# Altium PCB OFP_SCM_v1.5.PcbDoc (part 2 of 3)
Units mil, origin at the board's own origin, x right, y up, seen from the top; angles counter-clockwise.
Board outline 4724.41 x 4330.71 mil, 2 copper layers (Top Layer, Bottom Layer), stack 62.256 mil thick; 99 components, 80 nets, 450 pads, 371 vias.
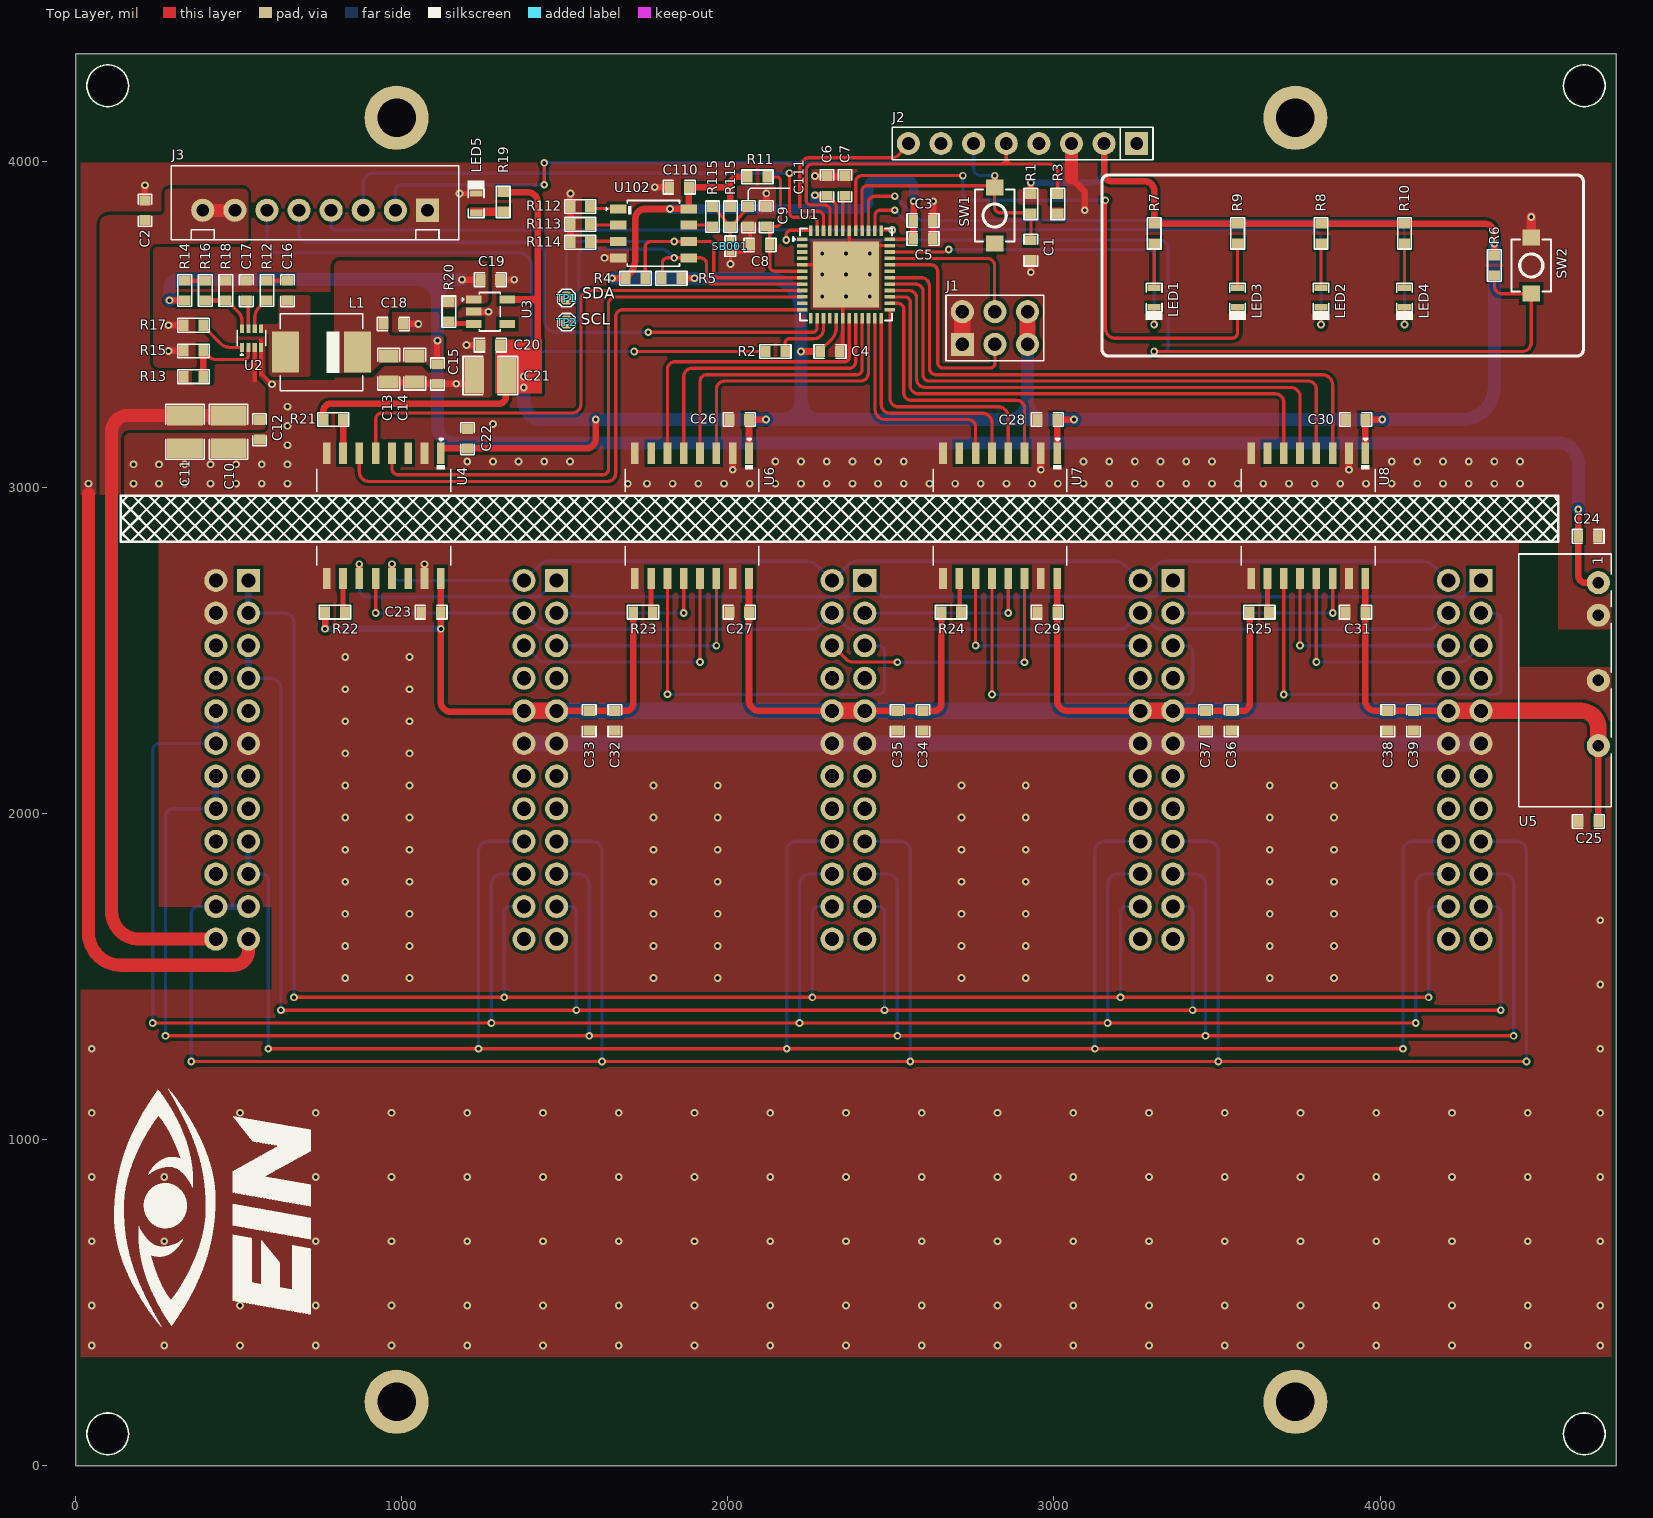
[diagram p0: Top Layer view]

## Via types
v1: diameter 23.62, hole 11.81, Top Layer to Bottom Layer, tented both sides, 371 vias

## Nets (pads, with @x,y where several pads share a name; then routed paths per layer and width w, separated by ;. In a path a pad name is that pad's centre, name@x,y a point inside that pad or via, vN(x,y) a via of type N, cw(c..) or ccw(c..) an arc to the next point about the centre after c; other vN are vias at no path point) (continued)
+3V3: (continued)
  Top Layer w20: v1(764.88,2566.93) R22.2@764.88,2618.11 ; C23.2@1119.88,2618.11 1119.88,2615.35 v1(1119.88,2566.93) 1119.88,2343.65 ccw(c1150.93,2343.65) 1150.93,2312.6 J5.10@1374.8,2312.6 ; C23.2@1119.88,2623.11 U4.16@1119.88,2721.46 ; J5.9@1474.8,2315.35 C33.2@1574.8,2315.35 C32.2@1653.54,2315.35 1688.09,2315.35 ccw(c1688.09,2337.03) 1709.76,2337.03 R23.1@1709.76,2618.11 ; C27.2@2064.76,2618.11 2064.76,2346.41 ccw(c2095.82,2346.41) 2095.82,2315.35 J6.10@2319.68,2315.35 ; U6.16@2064.76,2721.46 2064.76,2623.11 ccw(c2069.76,2623.11) C27.2@2069.76,2618.11 ; J6.9@2419.68,2315.35 C35.2@2519.68,2315.35 C34.2@2598.42,2315.35 2632.97,2315.35 ccw(c2632.97,2337.03) 2654.65,2337.03 R24.1@2654.65,2618.11 ; C29.2@3009.65,2618.11 3009.65,2346.41 ccw(c3040.7,2346.41) 3040.7,2315.35 J7.10@3264.57,2315.35 ; U7.16@3009.65,2721.46 3009.65,2623.11 ccw(c3014.65,2623.11) C29.2@3014.65,2618.11 ; J7.9@3364.57,2315.35 C37.2@3464.57,2315.35 C36.2@3543.31,2315.35 3577.85,2315.35 ccw(c3577.85,2337.03) 3599.53,2337.03 R25.1@3599.53,2618.11 ; U8.16@3954.53,2721.46 C31.2@3954.53,2618.11 3954.53,2346.41 ccw(c3985.58,2346.41) 3985.58,2315.35 C38.2@4023.62,2315.35 C39.2@4102.36,2315.35 J8.10@4209.45,2315.35 ; U5.6@4669.29,2208.66 4669.29,1978.82 ccw(c4671.73,1978.82) C25.2@4671.73,1976.38
  Top Layer w50: J5.10@1374.8,2315.35 J5.9@1474.8,2315.35 ; J6.10@2319.68,2315.35 J6.9@2419.68,2315.35 ; J7.10@3264.57,2315.35 J7.9@3364.57,2315.35 ; J8.10@4209.45,2315.35 J8.9@4309.45,2315.35 4616.64,2315.35 cw(c4616.64,2262.7) 4669.29,2262.7 U5.6@4669.29,2208.66
  Bottom Layer w20: v1(764.88,2566.93) v1(1119.88,2566.93)
  Bottom Layer w50: J5.10@1374.8,2315.35 J5.9@1474.8,2315.35 J6.10@2319.68,2315.35 J6.9@2419.68,2315.35 J7.10@3264.57,2315.35 J7.9@3364.57,2315.35 J8.10@4209.45,2315.35 J8.9@4309.45,2315.35
+5V: C13.2 C14.2 C15.2 C18.2 C19.2 C24.2 L1.2 R14.2 R20.2 U3.1 U5.1 | length 5680.9
  Top Layer w20: v1(288.03,3574.17) R14.2@334.65,3574.17 ; C15.2@1109.49,3378.27 v1(1109.49,3450.63) ; v1(1185.04,3637.8) C19.2@1241.65,3637.8 ; v1(4607.61,2933.07) 4607.61,2729.49 ccw(c4628.44,2729.49) 4628.44,2708.66 U5.1@4669.29,2708.66
  Bottom Layer w40: v1(288.03,3574.17) 288.03,3608.78 cw(c317.05,3608.78) 317.05,3637.8 1050.87,3637.8 ; v1(1185.04,3637.8) 1168.11,3637.8 ; v1(4607.61,2933.07) 4607.61,3073.95 ccw(c4544.56,3073.95) 4544.56,3137 1159.23,3137 cw(c1159.23,3186.74) 1109.49,3186.74 v1(1109.49,3450.63) 1109.49,3579.17 ; 1050.87,3637.8 cw(c1050.87,3579.17) 1109.49,3579.17 ; 1050.87,3637.8 1168.11,3637.8 ; 1109.49,3579.17 cw(c1168.11,3579.17) 1168.11,3637.8
BTN_STATUS: R6.1 SW2.2 U1.48 | length 3119.7
  Top Layer w10: v1(2179.11,3759.53) 2179.11,3774.72 cw(c2193.16,3774.72) 2193.16,3788.78 U1.48@2253.94,3788.78 ; v1(3307.09,3417.32) 4435.12,3417.32 ccw(c4435.12,3445.71) 4463.5,3445.71 4463.5,3594.49 4374.02,3594.49 cw(c4374.02,3618.11) 4350.39,3618.11 R6.1@4350.39,3653.54
  Bottom Layer w10: v1(2179.11,3759.53) 3323.27,3759.53 cw(c3323.27,3732.8) 3350,3732.8 3350,3432.03 cw(c3335.29,3432.03) 3335.29,3417.32 v1(3307.09,3417.32)
GND: C1.1 C2.1 C3.1 C4.1 C5.1 C6.1 C7.1 C8.1 C9.1 C10.1 C11.1 C12.1 C13.1 C14.1 C15.1 C17.1 C18.1 C19.1 C20.1 C21.1 C22.1 C24.1 C26.1 C28.1 C30.1 C110.2 C111.2 J1.1 J1.2 J2.3 J3.1 J4.23 LED5.2 R15.2 R17.1 R18.1 R112.2 R113.2 R114.2 SB001.2 SW2.1 U1.5 U1.18 U1.35 U1.42 U1.49 U2.4 U3.2 U4.2 U4.8 U5.2 U6.2 U6.8 U7.2 U7.8 U8.2 U8.8 U102.4 | length 4662.8
  Top Layer w10: U2.4@568.9,3429.57 568.9,3350.53 v1(602.4,3317.03) ; v1(2007.87,3685.85) 2007.87,3722.25 2049.08,3722.25 2068.42,3741.59 C8.1@2068.42,3744.09 2068.42,3795.27 ccw(c2062.99,3795.27) C111.2@2062.99,3800.71 ; U1.5@2228.05,3683.07 2332.67,3683.07 v1(2362.2,3653.54) ; C4.1@2333.15,3417.32 C4.1@2343.15,3417.32 ccw(c2343.15,3426.54) 2352.36,3426.54 U1.18@2352.36,3518.31 ; U1.18@2352.36,3519.39 2352.36,3643.7 v1(2362.2,3653.54) ; U1.42@2372.04,3787.69 U1.49@2372.04,3663.38 ; U1.35@2496.35,3742.12 2450.78,3742.12 U1.49@2372.04,3663.38 ; v1(2362.2,3653.54) U1.49@2372.04,3663.38
  Top Layer w15: v1(1177.16,3901.73) LED5.2@1228.35,3901.73
  Top Layer w20: C2.1@212.6,3880.39 v1(212.6,3927.01) ; v1(285.03,3419.13) R15.2@331.65,3419.13 ; v1(285.03,3497.87) R17.1@331.65,3497.87 ; C13.1@959.88,3323.39 C14.1@1039.88,3323.39 1045,3318.27 C15.1@1109.49,3318.27 v1(1167.32,3318.27) 1201.65,3318.27 1231.65,3348.27 C21.1@1231.65,3362.2 ; C18.1@1004.25,3501.81 v1(1050.87,3501.81) ; U4.2@1069.88,3101.39 U4.2@1069.88,3105.31 ; v1(1198.35,3437.01) C20.1@1241.65,3437.01 ; U3.2@1222.44,3539.37 v1(1265.75,3539.37) ; C19.1@1301.65,3637.8 v1(1344.96,3637.8) ; R114.2@1517.24,3751.97 R113.2@1517.24,3807.08 R112.2@1517.24,3862.2 v1(1517.24,3901.57) ; v1(1621.57,3704.53) U102.4@1664.88,3704.53 ; v1(1775.59,3921.26) C110.2@1820.39,3921.26 ; v1(2014.76,3054.54) U6.2@2014.76,3101.39 ; C9.1@2118.11,3860.71 v1(2118.11,3902.32) ; v1@2266.9,3955.2 C7.1@2359.08,3955.2 ; C5.1@2628.42,3763.78 C3.1@2628.42,3818.9 2629.17,3819.65 2629.17,3877.2 v1(2629.92,3877.95) ; v1(2929.13,3660.47) C1.1@2929.13,3698.35 ; v1(2959.65,3054.54) U7.2@2959.65,3101.39 ; 3053.15,3949.04 3094.49,3907.7 v1(3094.49,3850.39) ; v1(3904.53,3054.54) U8.2@3904.53,3101.39
  Top Layer w30: SW2.1@4463.5,3767.72 v1(4463.5,3829.65)
  Top Layer w40: 39.37,2980.31 39.37,1635.43 ccw(c139.37,1635.43) 139.37,1535.43 485.43,1535.43 ccw(c485.43,1579.92) 529.92,1579.92 J4.23@529.92,1615.35 ; 3053.15,3949.04 J2.3@3053.15,4054.72
  Top Layer w50: J1.1@2718.9,3439.37 J1.2@2718.9,3539.37
  other v1: 39.37,3012.13 177.16,3012.13 255.91,3012.13 334.65,3012.13 413.39,3012.13 492.13,3012.13 570.87,3012.13 649.61,3012.13 1693.36,3012.04 1751.97,3012.13 1830.71,3012.13 1909.45,3012.13 1988.19,3012.13 2066.93,3012.13 2145.67,3012.13 2224.41,3012.13 2303.15,3012.13 2381.89,3012.13 2460.63,3012.13 2539.37,3012.13 2618.11,3012.13 2696.85,3012.13 2775.59,3012.13 2854.33,3012.13 2933.07,3012.13 3011.81,3012.13 3090.55,3012.13 3169.29,3012.13 3248.03,3012.13 3326.77,3012.13 3405.51,3012.13 3484.25,3012.13 3562.99,3012.13 3641.73,3012.13 3720.47,3012.13 3799.21,3012.13 3877.95,3012.13 3956.69,3012.13 4035.43,3012.13 4114.17,3012.13 4192.91,3012.13 4271.65,3012.13 4350.39,3012.13 4429.13,3012.13 177.16,3071.18 255.91,3071.18 334.65,3071.18 413.39,3071.18 492.13,3071.18 570.87,3071.18 649.61,3071.18 1200.79,3080.24 1279.53,3080.24 1358.27,3080.24 1437.01,3080.24 1515.75,3080.24 2145.67,3080.24 2224.41,3080.24 2303.15,3080.24 2381.89,3080.24 2460.63,3080.24 2539.37,3080.24 3090.55,3080.24 3169.29,3080.24 3248.03,3080.24 3326.77,3080.24 3405.51,3080.24 3484.25,3080.24 4035.43,3080.24 4114.17,3080.24 4192.91,3080.24 4271.65,3080.24 4350.39,3080.24 4429.13,3080.24 649.61,3130.24 649.6,3189.29 1279.53,3195 649.6,3248.35 2289.53,3585.87 2362.2,3585.87 2434.88,3585.87 2289.53,3653.54 2434.88,3653.54 2289.53,3717.72 2362.2,3717.72 2434.88,3717.72 2267.34,3955.2
I2C_SCL: R5.1 TP2.1 U1.8 U102.5 | length 1098.8
  Top Layer w10: R5.1@1799.21,3641.73 1799.21,3688.76 cw(c1814.98,3688.76) 1814.98,3704.53 U102.5@1879.92,3704.53 1900.51,3704.53 1908.79,3704.53 1915.84,3704.53 cw(c1915.84,3685.85) 1934.51,3685.85 1934.51,3641.85 ccw(c1952.34,3641.85) 1952.34,3624.02 U1.8@2226.97,3624.02
  Bottom Layer w10: v1(1505.4,3507.32) 1530.32,3507.32 ccw(c1530.32,3520) 1543,3520 1543,3714.03 cw(c1559.93,3714.03) 1559.93,3730.97 1616.4,3730.97 ccw(c1616.35,3740.97) 1617.74,3731.06 cw(c1621.57,3704.53) 1625.42,3731.06 ccw(c1626.79,3740.97) 1626.75,3730.97 1795.91,3730.97 cw(c1795.91,3704.53) 1813.62,3724.16 v1(1835.39,3704.53)
I2C_SDA: R4.1 TP1.1 U1.7 U102.6 | length 1189.9
  Top Layer w10: R4.1@1746.34,3654.23 R4.1@1746.54,3641.73 1746.54,3737.8 cw(c1763.17,3737.8) 1763.17,3754.43 v1(1835.39,3754.43) 1878.42,3754.53 U102.6@1879.92,3754.53 1942.72,3754.53 cw(c1942.72,3740.36) 1956.84,3741.46 cw(c1946.87,3740.71) 1956.87,3740.71 1956.87,3657.96 ccw(c1971.13,3657.96) 1971.13,3643.7 ; 1971.18,3643.7 U1.7@2226.97,3643.7
  Bottom Layer w10: v1(1505.4,3581.33) 1505.4,3730.35 cw(c1529.48,3730.35) 1529.48,3754.43 v1(1835.39,3754.43)
LED_STATUS1: LED1.2 U1.34 | length 1081.6
  Top Layer w10: U1.34@2496.35,3722.44 2658.24,3722.44 ccw(c2658.24,3749.21) v1(2677.16,3730.28) ; v1(3307.09,3500) LED1.2@3307.09,3547.24
  Bottom Layer w10: v1(2677.16,3730.28) 3286.74,3730.28 cw(c3286.74,3709.94) 3307.09,3709.94 v1(3307.09,3500)
LED_STATUS2: LED3.2 U1.41 | length 1890.1
  Top Layer w10: U1.41@2391.73,3787.69 2391.73,3937.01 cw(c2411.41,3937.01) 2411.41,3956.69 v1(2720.47,3956.69) ; v1(3157.48,3880.77) 3157.48,3489.09 ccw(c3188.93,3489.09) 3188.93,3457.65 3545.26,3457.65 ccw(c3545.26,3475.38) 3562.99,3475.38 LED3.2@3562.99,3547.24
  Bottom Layer w10: v1(2720.47,3956.69) 2720.47,3902.29 ccw(c2741.98,3902.29) 2741.98,3880.77 v1(3157.48,3880.77)
LED_STATUS3: LED2.2 U1.38 | length 1772.3
  Top Layer w10: U1.38@2450.78,3787.69 2450.79,3834.17 cw(c2467.01,3834.17) 2467.01,3850.39 v1(2511.81,3850.39) ; v1(3818.9,3500) LED2.2@3818.9,3547.24
  Bottom Layer w10: v1(2511.81,3850.39) 2559.86,3802.34 2559.91,3802.3 ccw(c2586.36,3828.75) 2586.36,3791.34 ; 2586.41,3791.34 3788.62,3791.34 cw(c3788.62,3761.06) 3818.9,3761.06 v1(3818.9,3500)
LED_STATUS4: LED4.2 U1.39 | length 2118.7
  Top Layer w10: U1.39@2431.1,3788.78 2431.1,3874.02 cw(c2450.78,3874.02) 2450.78,3893.7 v1(2511.81,3893.7) ; v1(4074.8,3500) LED4.2@4074.8,3547.24
  Bottom Layer w10: v1(2511.81,3893.7) 2577.67,3827.84 2577.73,3827.78 ccw(c2599.17,3849.22) 2599.17,3818.9 ; 2599.22,3818.9 4034.58,3818.9 cw(c4034.58,3778.67) 4074.8,3778.67 v1(4074.8,3500)
MB_RXD: J3.3 U1.47 | length 1655.6
  Top Layer w10: v1(2188.98,3964.25) 2188.98,3842.97 ccw(c2202.75,3842.97) 2202.75,3829.2 2258.79,3829.2 cw(c2258.79,3814.37) 2273.62,3814.37 U1.47@2273.62,3788.78
  Bottom Layer w10: J3.3@881.89,3850.39 881.89,3933.51 cw(c912.63,3933.51) 912.63,3964.25 v1(2188.98,3964.25)
MB_TXD: J3.4 U1.37 | length 1812.6
  Top Layer w10: U1.37@2470.47,3787.69 2470.47,3789.49 2470.99,3790 v1(2503.94,3790)
  Bottom Layer w10: J3.4@783.46,3850.39 783.46,3802.04 ccw(c795.76,3802.04) 795.76,3789.74 v1@2505.18,3789.74
MISO: J5.1 J6.1 J7.1 J8.1 U4.11 | length 3702.8
  Top Layer w20: U4.11@869.88,2725.39 v1(869.88,2765.31)
  Bottom Layer w10: v1(869.88,2765.31) 869.88,2689.3 ccw(c893.83,2689.3) 893.83,2665.35 1412.95,2665.35 ; 1412.99,2665.35 ccw(c1412.99,2691.36) 1431.29,2672.87 ; 1431.43,2673.01 J5.1@1474.8,2715.35 1518.17,2673.02 ; 1518.31,2672.88 ccw(c1536.61,2691.37) 1536.61,2665.35 ; 1536.65,2665.35 2357.88,2665.35 ccw(c2357.88,2691.37) 2376.18,2672.88 ; 2376.31,2673.02 J6.1@2419.68,2715.35 ; J6.1@2419.68,2715.35 2463.05,2673.02 ; 2463.19,2672.88 ccw(c2481.49,2691.37) 2481.49,2665.35 3302.76,2665.35 ccw(c3302.76,2691.36) 3321.06,2672.87 ; 3321.2,2673.01 J7.1@3364.57,2715.35 3407.93,2673.01 ; 3408.07,2672.87 ccw(c3426.37,2691.36) 3426.37,2665.34 4247.64,2665.34 ccw(c4247.64,2691.35) 4265.94,2672.86 ; 4266.08,2673 J8.1@4309.45,2715.35
MOSI: J5.4 J6.4 J7.4 J8.4 U4.12 | length 3514.4
  Top Layer w10: v1(919.88,2615.35) U4.12@919.88,2721.46 U4.12@919.88,2725.39
  Bottom Layer w10: v1(919.88,2615.35) J5.4@1374.8,2615.35 1418.17,2573.01 1418.31,2572.88 ccw(c1436.61,2591.37) 1436.61,2565.35 2257.88,2565.35 ccw(c2257.88,2591.37) 2276.18,2572.88 ; 2276.31,2573.02 J6.4@2319.68,2615.35 ; J6.4@2319.68,2615.35 2363.05,2573.02 ; 2363.19,2572.88 ccw(c2381.49,2591.37) 2381.49,2565.35 3202.76,2565.35 ccw(c3202.76,2591.37) 3221.06,2572.88 ; 3221.2,2573.02 J7.4@3264.57,2615.35 3307.93,2573.02 ; 3308.07,2572.88 ccw(c3326.37,2591.37) 3326.37,2565.35 4147.64,2565.35 ccw(c4147.64,2591.37) 4165.94,2572.88 ; 4166.08,2573.02 J8.4@4209.45,2615.35
NetC16_1: C16.1 L1.1 U2.5
NetC16_2: C16.2 R12.2 | length 63
  Top Layer w15: R12.2@586.61,3634.17 C16.2@649.61,3634.17
NetC17_2: C17.2 U2.7 | length 89.2
  Top Layer w10: C17.2@523.62,3584.17 529.53,3578.27 U2.7@529.53,3497.44
NetLED1_1: LED1.1 R7.1 | length 133.9
  Top Layer w10: LED1.1@3307.09,3618.11 R7.1@3307.09,3751.97
NetLED2_1: LED2.1 R8.1 | length 137.3
  Top Layer w10: LED2.1@3818.9,3612.2 R8.1@3818.9,3749.53
NetLED3_1: LED3.1 R9.1 | length 137.3
  Top Layer w10: LED3.1@3562.99,3612.2 R9.1@3562.99,3749.53
NetLED4_1: LED4.1 R10.1 | length 133.9
  Top Layer w10: LED4.1@4074.8,3618.11 R10.1@4074.8,3751.97
NetLED5_1: LED5.1 R19.1
NetR2_1: R2.1 U1.15 | length 200.2
  Top Layer w10: R2.1@2175.67,3417.32 2175.67,3443.39 cw(c2188.98,3443.39) 2188.98,3456.69 2263.78,3456.69 ccw(c2263.78,3486.22) 2293.31,3486.22 U1.15@2293.31,3518.31
NetR12_1: R12.1 U2.6 | length 87
  Top Layer w10: U2.6@549.21,3497.44 549.21,3521.57 cw(c591.72,3521.57) 561.66,3551.63 574.11,3564.08 574.11,3564.17 582.36,3572.42 R12.1@582.46,3572.42
NetR13_2: R13.2 R15.1 U2.2 | length 255.1
  Top Layer w10: R15.1@391.65,3419.13 409.66,3401.12 ccw(c428.86,3420.35) 428.86,3393.18 517.87,3393.18 ccw(c517.87,3404.84) 529.53,3404.84 U2.2@529.53,3429.57
  Top Layer w20: R13.2@391.65,3340.39 R15.1@391.65,3416.63
NetR14_1: R14.1 R16.2 | length 63
  Top Layer w15: R14.1@334.65,3634.17 R16.2@397.64,3634.17
NetR16_1: R16.1 R18.2 U2.8 | length 160.2
  Top Layer w10: R18.2@460.63,3574.17 470.63,3564.17 473.44,3564.17 499.12,3538.5 cw(c473.22,3512.61) 509.84,3512.61 U2.8@509.84,3497.44
  Top Layer w15: R16.1@397.64,3574.17 R18.2@460.63,3574.17
NetR17_2: R17.2 U2.1 | length 146.3
  Top Layer w10: R17.2@391.65,3497.87 401.65,3487.87 401.65,3484.83 443.72,3442.76 ccw(c475.56,3474.6) 475.56,3429.57 U2.1@509.84,3429.57
NetR20_1: R20.1 U3.3 | length 78.3
  Top Layer w10: R20.1@1144.48,3509.37 1156.98,3501.78 R20.1@1160.2,3501.78
  Top Layer w15: R20.1@1160.2,3503.65 1204.07,3503.65 U3.3@1220.58,3501.97
NetR21_1: R21.1 U4.7 | length 108.7
  Top Layer w10: R21.1@819.88,3206.1 cw(c822.44,3206.1) R21.1@822.44,3208.66
  Top Layer w20: U4.7@819.88,3101.39 R21.1@819.88,3206.1
NetR22_1: R22.1 U4.10 | length 102.4
  Top Layer w10: U4.10@819.88,2725.39 cw(c819.88,2722.83) U4.10@822.44,2722.83
  Top Layer w15: R22.1@819.88,2623.11 U4.10@819.88,2721.46
NetR23_2: R23.2 U6.10 | length 102.4
  Top Layer w10: U6.10@1764.76,2725.39 cw(c1764.76,2722.83) U6.10@1767.32,2722.83
  Top Layer w15: R23.2@1764.76,2623.11 U6.10@1764.76,2721.46